# Altium PCB Type-C Tester.PcbDoc (part 2 of 2)
Units mil, origin at the board's own origin, x right, y up, seen from the top; angles counter-clockwise.
Board outline 1977.45 x 1150.64 mil, 2 copper layers (Top Layer, Bottom Layer); 31 components, 22 nets, 168 pads, 38 vias.
Unrouted connection lines stored in the file: 2.
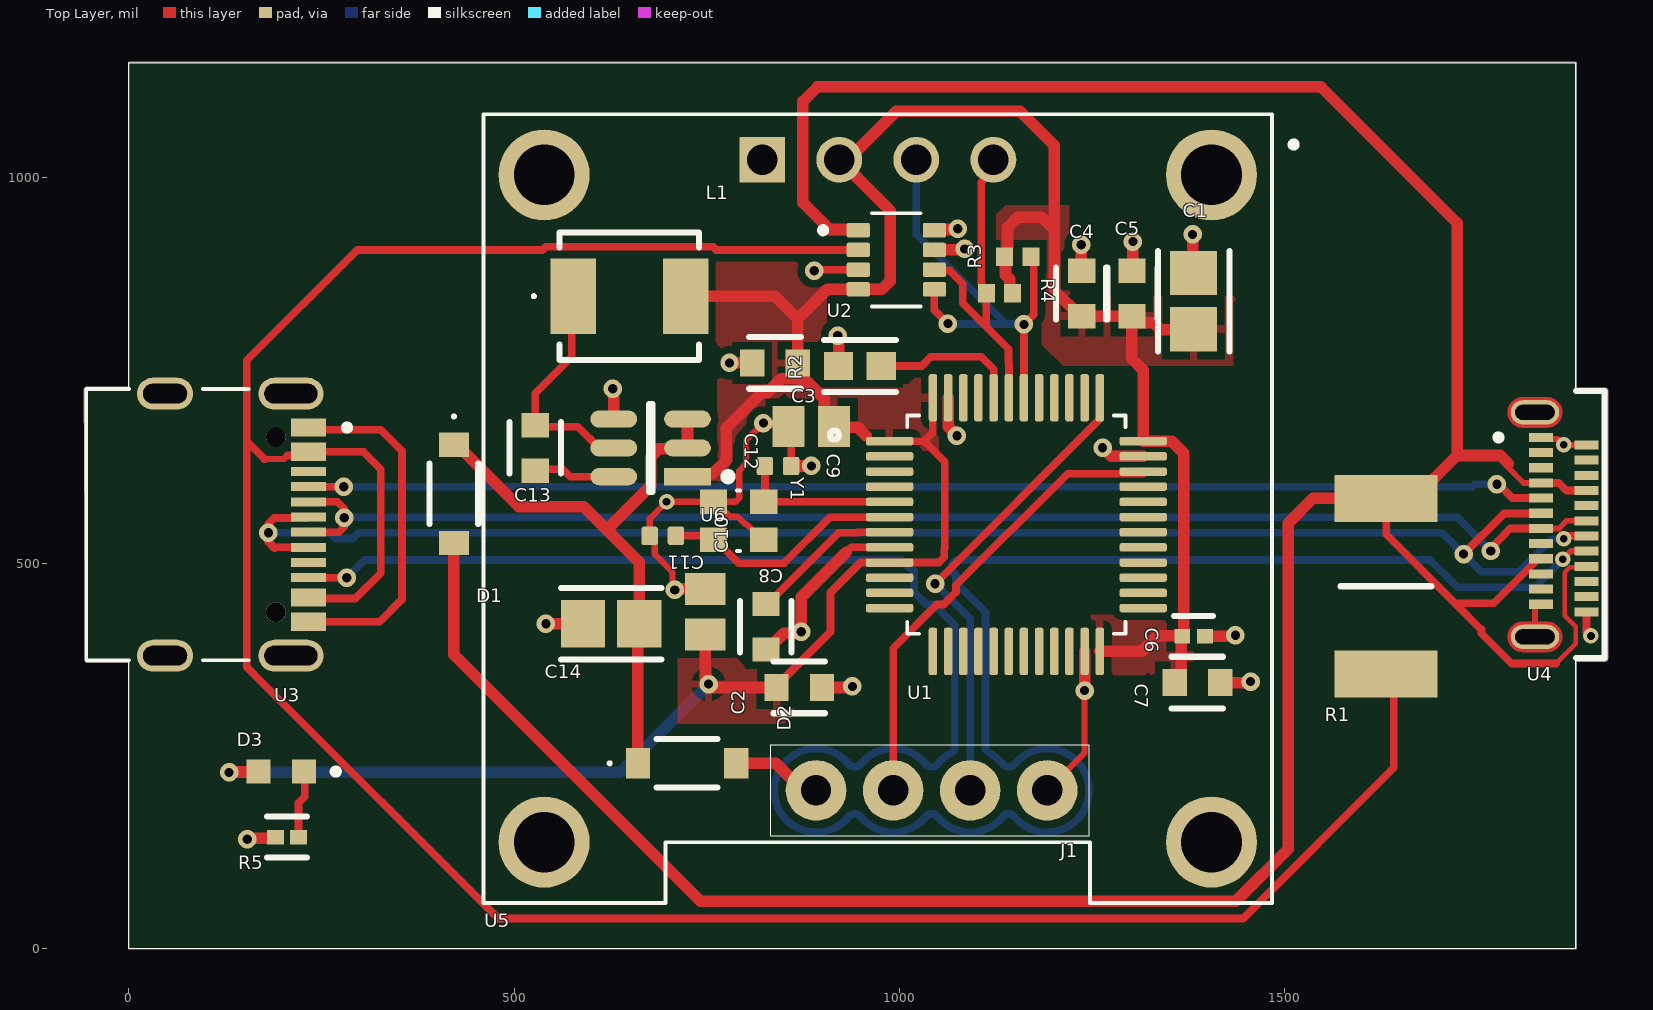
[diagram p0: Top Layer view]

## Via types
v1: diameter 24, hole 12, Top Layer to Bottom Layer, 33 vias
v2: diameter 20, hole 10, Top Layer to Bottom Layer, 5 vias

## Nets (pads, with @x,y where several pads share a name; then routed paths per layer and width w, separated by ;. In a path a pad name is that pad's centre, name@x,y a point inside that pad or via, vN(x,y) a via of type N, cw(c..) or ccw(c..) an arc to the next point about the centre after c; other vN are vias at no path point) (continued)
NetR1_2: (continued)
  Top Layer w10: 176.05,634.98 152.95,658.07 ; 205.92,639.8 228.23,639.8 U3.A4B9 304.33,644.49 326.77,622.05 326.77,487.01 293.86,454.1 234.32,454.1 U3.A9B4 ; U2.2 762.36,906.5 758.18,910.67 541.03,910.67 536.86,906.5 296.26,906.5 152.95,763.19 152.95,658.07 ; R1.2 1641.73,345.98 1641.73,234.33 1446.15,38.74 479.36,38.74 173.85,344.25 152.95,365.15 152.95,394.7 152.95,658.07
NetR2_2: R2.2 U1.44 | length 194.5
  Top Layer w10: R2.2 1029.14,755.91 1040.95,767.72 1106.3,767.72 1122.36,751.65 U1.44
NetU3_A1B12: U3.A1B12 U3.A12B1 | length 460.2
  Top Layer w10: U3.A12B1 325.59,424.02 354.33,452.76 354.33,645.67 326.77,673.23 235.67,673.23 U3.A1B12
SW: C13.2 L1.1 U6.5 | length 301.7
  Top Layer w10: L1.1 574.8,844.49 574.8,767.72 527.56,720.47 C13.2 529.53,677.17 582.58,677.17 610.14,649.61 U6.5
SWDCLK: J1.3 U1.37 | length 616.9
  Top Layer w10: v1(1046.41,473.28) 1260.16,687.03 U1.37
  Bottom Layer w10: v1(1046.41,473.28) 1091.89,427.8 J1.3
SWDIO: J1.2 U1.34 | length 611
  Top Layer w10: J1.2 991.89,389.53 1048.64,446.28 1057.59,446.28 1073.41,462.1 1073.41,471.04 1218.44,616.08 1316.46,616.08 U1.34
VBUS_IN: D1.2 R1.1 U2.1 U4.A4 U4.A9 U4.B4 U4.B9 | length 4333.7
  Top Layer w6: 1852.24,369.65 1877.95,395.36 1877.95,417.32 1863.58,431.69 1863.58,488.19 1870.04,494.65 U4.B4@1890.67,494.65
  Top Layer w7.56: 1790.54,629.13 1787.91,626.5 1810.28,604.13 U4.A4
  Top Layer w8: U4.B4@1890.67,494.65 U4.B4
  Top Layer w10: R1.1 1631.89,537.4 1721.27,448.02 ; U4.A9 1831.61,504.49 1828.12,504.49 1771.65,448.02 1721.27,448.02 ; U4.A4 1856.01,604.13 1865.86,594.29 U4.B9 ; 1852.24,369.65 1794.81,369.65 1755.52,408.94 1755.52,413.77 1721.27,448.02
  Top Layer w12.28: U2.1 U2.1@946.65,933.44
  Top Layer w15: D1.2 421.89,381.26 741.91,61.24 1436.83,61.24 1504.64,129.06 1504.64,551.89 1536.93,584.17 R1.1 1668.31,584.17 1723.87,639.74 ; 929.13,933.07 909.45,933.07 874.86,967.66 874.86,1099.27 893.7,1118.11 1547.24,1118.11 1723.87,941.48 1723.87,639.74 ; 1790.54,629.13 1779.94,639.74 1723.87,639.74
VIN: C14.1 D1.1 D2.1 U6.2 U6.3 | length 773.6
  Top Layer w15: D1.1 425.83,653.78 506.23,573.38 590.28,573.38 620.22,543.44 ; D2.1 660.63,419.46 C14.1 662.43,501.23 620.22,543.44 ; U6.3 U6.2 723.63,648.21 687.58,648.21 677.17,637.8 677.17,618.11 677.12,618.06 677.12,600.34 620.22,543.44
pads on no net: U1.2 U1.3 U1.4 U1.10 U1.11 U1.12 U1.13 U1.14 U1.15 U1.16 U1.17 U1.18 U1.19 U1.20 U1.21 U1.22 U1.25 U1.26 U1.27 U1.28 U1.29 U1.30 U1.31 U1.32 U1.33 U1.38 U1.39 U1.40 U1.41 U1.45 U1.46 U3. U3.A8 U3.B8 U3.SH1 U3.SH2 U3.SH3 U3.SH4 U4.A2 U4.A3 U4.A8 U4.A10 U4.A11 U4.B2 U4.B3 U4.B8 U4.B10 U4.B11 U5.S1 U5.S2 U5.S3 U5.S4
copper on no net: | length 0.1
  Top Layer w6: 1862.04,379.4 1862.1,379.46

## Polygon pours and split planes (outlines as drawn)
+3.3V on Top Layer "+3.3V_L01_P000" (solid, pour order 0): 1248.03,433.07 1381.89,433.07 1381.89,303.15 1374.02,311.02 1330.71,311.02 1330.71,350.39 1322.83,358.27 1318.9,354.33 1248.03,354.33
+3.3V on Top Layer "+3.3V_L01_P003" (solid, pour order 3): 661.42,791.34 669.29,783.46 763.78,783.46 763.78,637.8 755.91,629.92 688.98,629.92 688.98,590.55 692.91,594.49 783.46,594.49 783.46,653.54 850.39,720.47 885.83,685.04 885.83,645.67 1051.18,645.67 1051.18,751.97 1031.5,751.97 1011.81,732.28 905.51,732.28 905.51,909.45 661.42,909.45
+3.3V on Top Layer "+3.3V_L01_P001" (solid, pour order 1): 712.6,440.94 783.46,440.94 783.46,381.89 803.15,362.2 866.14,362.2 866.14,307.09 850.39,291.34 712.6,291.34
+3.3V on Top Layer "+3.3V_L01_P004" (solid, pour order 4): 1125.98,838.58 1125.98,952.76 1137.8,964.57 1220.47,964.57 1220.47,854.33 1228.35,846.46 1440.94,846.46 1433.07,838.58 1433.07,755.91 1212.6,755.91 1185.04,783.46 1185.04,838.58
GND on Bottom Layer "GND_L02_P006" (solid, pour order 6): 125.98,454.19 125.98,0 1850.39,11.81 1850.39,370.08 1913.39,370.08 1913.39,454.19
GND on Bottom Layer "GND_L02_P005" (solid, pour order 5): 125.98,629.92 125.98,1094.49 1850.39,1082.68 1850.39,724.41 1913.39,724.41 1913.39,629.92

## Silkscreen, mask and mechanical layers (free items; w line width, h text height)
Top Overlay:
  lines w1: 0,374.02 0,0 146.89,0 1878.11,0 ; 0,725.98 0,1149.61 206.5,1149.61 1878.11,1149.61 1878.11,723.23 ; 1878.11,376.77 1878.11,0 ; 1878.11,0 1878.11,0
  lines w7.87: 1915.51,376.77 1915.51,673.03